# Altium PCB StickHub.altium-ascii.PcbDoc (part 1 of 2)
Units mil, origin at the board's own origin, x right, y up, seen from the top; angles counter-clockwise.
Board outline 649.61 x 1574.8 mil, 2 copper layers (Top Layer, Bottom Layer), stack 65.792 mil thick; 94 components, 47 nets, 278 pads, 87 vias.
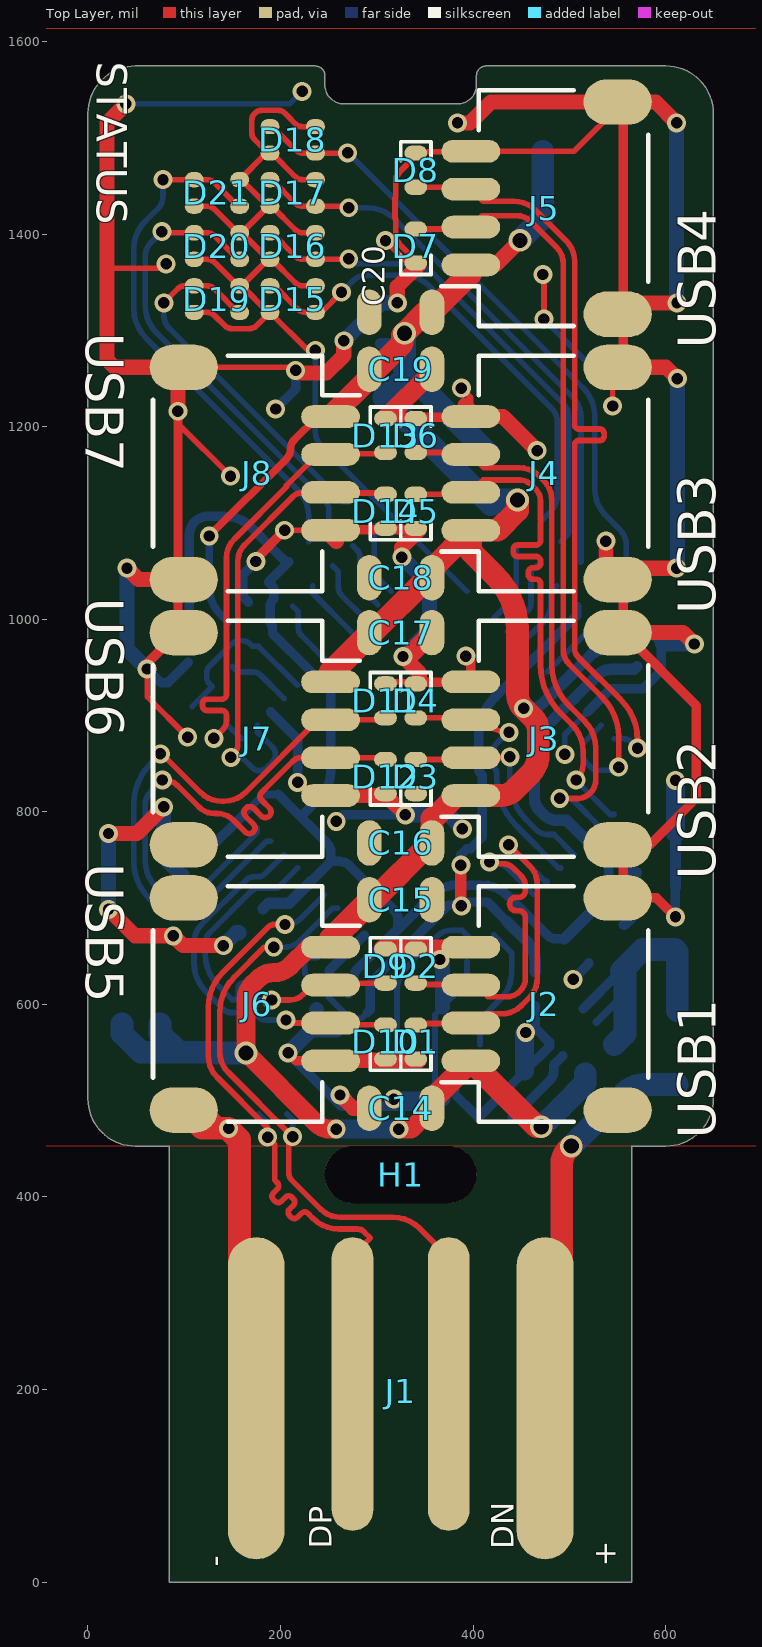
[diagram p0: Top Layer view]
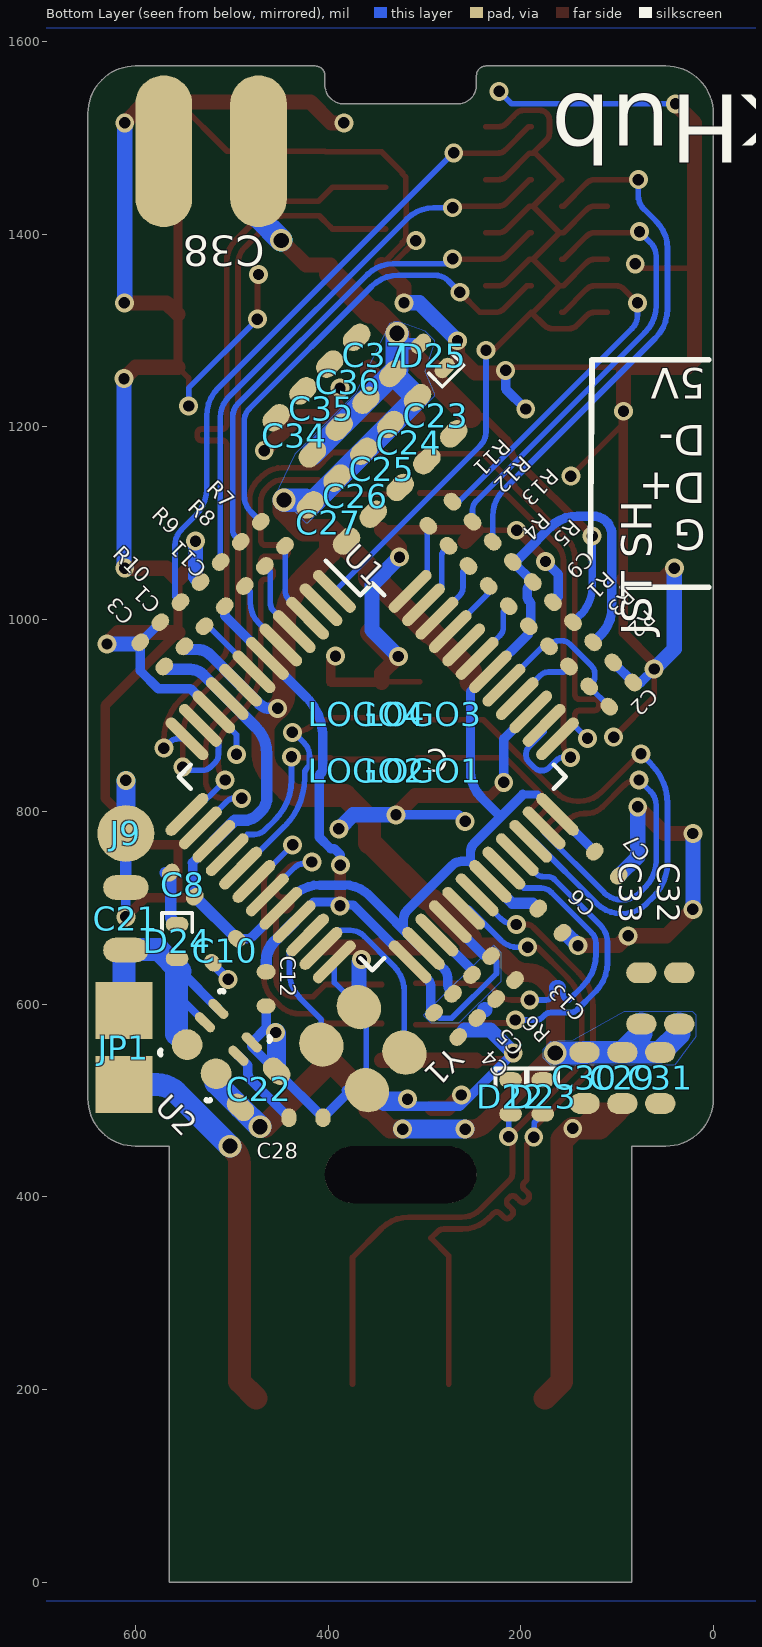
[diagram p1: Bottom Layer view, seen from below]

## Layer stack, top to bottom
Top Solder: solder mask 0.4, Solder Resist, Dk 3.5
Top Layer: signal copper 1.4
Dielectric 1: core 62.9921, FR-4, Dk 4.5
Bottom Layer: signal copper 1.4
Bottom Solder: solder mask 0.4, Solder Resist, Dk 3.5

## Board outline
403.54,1555.12 403.54,1564.96 cw(c413.39,1564.96) 413.39,1574.8 600.39,1574.8 cw(c600.39,1525.59) 649.61,1525.59 649.61,501.97 cw(c600.39,501.97) 600.39,452.76 564.96,452.76 564.96,0 84.65,0 84.65,452.76 49.21,452.76 cw(c49.21,501.97) 0,501.97 0,1525.59 cw(c49.21,1525.59) 49.21,1574.8 236.22,1574.8 cw(c236.22,1564.96) 246.06,1564.96 246.06,1555.12 ccw(c265.75,1555.12) 265.75,1535.43 383.86,1535.43 ccw(c383.86,1555.12)

## Design rules (kind name [scope] priority, off if disabled: settings)
AssemblyTestPointUsage [All] p0: scope1count=1 scope1_0_kind=Board scope1_0_value=Board scope2count=1 scope2_0_kind=Board scope2_0_value=Board commentlength=0
AssemblyTestpoint [All] p0: scope1count=1 scope1_0_kind=Board scope1_0_value=Board scope2count=1 scope2_0_kind=Board scope2_0_value=Board commentlength=0
BoardOutlineClearance [All] p0: scope1count=1 scope1_0_kind=Board scope1_0_value=Board scope2count=1 scope2_0_kind=Board scope2_0_value=Board commentlength=0 gap=0
BoardOutlineClearance [All] p1: gap=0 ignorepadtopadclearanceinfootprint=FALSE
Clearance [All] p0: scope1count=1 scope1_0_kind=Board scope1_0_value=Board scope2count=1 scope2_0_kind=Board scope2_0_value=Board commentlength=0 gap=5.91
Clearance [All] p1: gap=5.91 ignorepadtopadclearanceinfootprint=FALSE
ComponentClearance [All] p0: scope1count=1 scope1_0_kind=Board scope1_0_value=Board scope2count=1 scope2_0_kind=Board scope2_0_value=Board commentlength=0 gap=10 collisioncheckmode=3
DiffPairsRouting [All] p0: scope1count=1 scope1_0_kind=Board scope1_0_value=Board scope2count=1 scope2_0_kind=Board scope2_0_value=Board commentlength=0
DiffPairsRouting [All] p1: maxlimit=5.91 minlimit=5.91 mostfreqgap=5.91 toplayer_minwidth=15 toplayer_maxwidth=15 toplayer_prefwidth=5.91 bottomlayer_minwidth=15 bottomlayer_maxwidth=15 bottomlayer_prefwidth=15 maxuncoupledlength=500
FabricationTestPointUsage [All] p0: scope1count=1 scope1_0_kind=Board scope1_0_value=Board scope2count=1 scope2_0_kind=Board scope2_0_value=Board commentlength=0 valid=0 allowmultiple=FALSE
FabricationTestpoint [All] p0: scope1count=1 scope1_0_kind=Board scope1_0_value=Board scope2count=1 scope2_0_kind=Board scope2_0_value=Board commentlength=0 side=3 testpointundercomponent=TRUE minsize=40 maxsize=100 preferedsize=60 minholesize=0 maxholesize=40 preferedholesize=32 testpointgrid=1
FanoutControl Fanout_BGA [All] p0 off: scope1count=1 scope1_0_kind=Board scope1_0_value=Board scope2count=1 scope2_0_kind=Board scope2_0_value=Board commentlength=69 // Protel DXP Scope 1 Expression Was: IsBGA   Fanout_BGA (Default Rule)
FanoutControl Fanout_LCC [All] p0 off: scope1count=1 scope1_0_kind=Board scope1_0_value=Board scope2count=1 scope2_0_kind=Board scope2_0_value=Board commentlength=69 // Protel DXP Scope 1 Expression Was: IsLCC   Fanout_LCC (Default Rule)
FanoutControl Fanout_SOIC [All] p0 off: scope1count=1 scope1_0_kind=Board scope1_0_value=Board scope2count=1 scope2_0_kind=Board scope2_0_value=Board commentlength=71 // Protel DXP Scope 1 Expression Was: IsSOIC   Fanout_SOIC (Default Rule)
FanoutControl Fanout_Small [All] p0 off: scope1count=1 scope1_0_kind=Board scope1_0_value=Board scope2count=1 scope2_0_kind=Board scope2_0_value=Board commentlength=84 // Protel DXP Scope 1 Expression Was: (CompPinCount < 5)   Fanout_Small (Default Rule)
FanoutControl Fanout_Default [All] p0: scope1count=1 scope1_0_kind=Board scope1_0_value=Board scope2count=1 scope2_0_kind=Board scope2_0_value=Board commentlength=30 // Fanout_Default (Default Rule)
Height [All] p0: scope1count=1 scope1_0_kind=Board scope1_0_value=Board scope2count=1 scope2_0_kind=Board scope2_0_value=Board commentlength=0
HoleSize [All] p0: scope1count=1 scope1_0_kind=Board scope1_0_value=Board scope2count=1 scope2_0_kind=Board scope2_0_value=Board commentlength=0 absolutevalues=TRUE maxlimit=157.48 minlimit=9.84 maxpercent=80.000 minpercent=20.000
HoleSize [All] p1: absolutevalues=TRUE maxlimit=157.48 minlimit=9.84 maxpercent=80.000 minpercent=20.000
HoleToHoleClearance [All] p0: scope1count=1 scope1_0_kind=Board scope1_0_value=Board scope2count=1 scope2_0_kind=Board scope2_0_value=Board commentlength=0
HoleToHoleClearance [All] p1: gap=9.84 allowstackedmicrovias=FALSE
LayerPairs [All] p0: scope1count=1 scope1_0_kind=Board scope1_0_value=Board scope2count=1 scope2_0_kind=Board scope2_0_value=Board commentlength=0 enforce=TRUE
MinimumAnnularRing [All] p0: scope1count=1 scope1_0_kind=Board scope1_0_value=Board scope2count=1 scope2_0_kind=Board scope2_0_value=Board commentlength=0 minimumring=3.94
MinimumAnnularRing [All] p1: minimumring=3.94
MinimumSolderMaskSliver [All] p0: scope1count=1 scope1_0_kind=Board scope1_0_value=Board scope2count=1 scope2_0_kind=Board scope2_0_value=Board commentlength=0
NetAntennae [All] p0: scope1count=1 scope1_0_kind=Board scope1_0_value=Board scope2count=1 scope2_0_kind=Board scope2_0_value=Board commentlength=0
PasteMaskExpansion [All] p0: scope1count=1 scope1_0_kind=Board scope1_0_value=Board scope2count=1 scope2_0_kind=Board scope2_0_value=Board commentlength=0 expansion=0
PlaneClearance [All] p0: scope1count=1 scope1_0_kind=Board scope1_0_value=Board scope2count=1 scope2_0_kind=Board scope2_0_value=Board commentlength=0 clearance=20
PlaneConnect [All] p0: scope1count=1 scope1_0_kind=Board scope1_0_value=Board scope2count=1 scope2_0_kind=Board scope2_0_value=Board commentlength=0 planeconnectstyle=Relief reliefexpansion=20 reliefentries=4 reliefconductorwidth=10 reliefairgap=10
PolygonConnect "PolygonConnect_Polygon 0" [All] p0 off: scope1count=1 scope1_0_kind=Board scope1_0_value=Board scope2count=1 scope2_0_kind=Board scope2_0_value=Board commentlength=66 connectstyle=Direct reliefconductorwidth=10 reliefentries=4 polygonreliefangle="90 Angle" // Protel DXP Scope 1 Expression Was: InNamedPolygon('Polygon 0')
PolygonConnect "PolygonConnect_Polygon 1" [All] p0 off: scope1count=1 scope1_0_kind=Board scope1_0_value=Board scope2count=1 scope2_0_kind=Board scope2_0_value=Board commentlength=66 connectstyle=Direct reliefconductorwidth=10 reliefentries=4 polygonreliefangle="90 Angle" // Protel DXP Scope 1 Expression Was: InNamedPolygon('Polygon 1')
PolygonConnect "PolygonConnect_Polygon 2" [All] p0 off: scope1count=1 scope1_0_kind=Board scope1_0_value=Board scope2count=1 scope2_0_kind=Board scope2_0_value=Board commentlength=66 connectstyle=Direct reliefconductorwidth=10 reliefentries=4 polygonreliefangle="90 Angle" // Protel DXP Scope 1 Expression Was: InNamedPolygon('Polygon 2')
PolygonConnect "PolygonConnect_Polygon 3" [All] p0 off: scope1count=1 scope1_0_kind=Board scope1_0_value=Board scope2count=1 scope2_0_kind=Board scope2_0_value=Board commentlength=66 connectstyle=Direct reliefconductorwidth=10 reliefentries=4 polygonreliefangle="90 Angle" // Protel DXP Scope 1 Expression Was: InNamedPolygon('Polygon 3')
PolygonConnect "PolygonConnect_Polygon 4" [All] p0 off: scope1count=1 scope1_0_kind=Board scope1_0_value=Board scope2count=1 scope2_0_kind=Board scope2_0_value=Board commentlength=66 connectstyle=Direct reliefconductorwidth=10 reliefentries=4 polygonreliefangle="90 Angle" // Protel DXP Scope 1 Expression Was: InNamedPolygon('Polygon 4')
PolygonConnect [All] p0: scope1count=1 scope1_0_kind=Board scope1_0_value=Board scope2count=1 scope2_0_kind=Board scope2_0_value=Board commentlength=0 connectstyle=Relief reliefconductorwidth=19.68 reliefentries=4 polygonreliefangle="90 Angle"
PolygonConnect "PolygonConnect_Polygon 0" [InNamedPolygon('Polygon 0')] p1: connectstyle=Direct reliefconductorwidth=10 reliefentries=4 polygonreliefangle="90 Angle" airgapwidth=10
PolygonConnect "PolygonConnect_Polygon 1" [InNamedPolygon('Polygon 1')] p2: connectstyle=Direct reliefconductorwidth=10 reliefentries=4 polygonreliefangle="90 Angle" airgapwidth=10
PolygonConnect "PolygonConnect_Polygon 2" [InNamedPolygon('Polygon 2')] p3: connectstyle=Direct reliefconductorwidth=10 reliefentries=4 polygonreliefangle="90 Angle" airgapwidth=10
PolygonConnect "PolygonConnect_Polygon 3" [InNamedPolygon('Polygon 3')] p4: connectstyle=Direct reliefconductorwidth=10 reliefentries=4 polygonreliefangle="90 Angle" airgapwidth=10
PolygonConnect "PolygonConnect_Polygon 4" [InNamedPolygon('Polygon 4')] p5: connectstyle=Direct reliefconductorwidth=10 reliefentries=4 polygonreliefangle="90 Angle" airgapwidth=10
PolygonConnect [All] p6: connectstyle=Relief reliefconductorwidth=19.68 reliefentries=4 polygonreliefangle="90 Angle" airgapwidth=19.68
RoutingCorners [All] p0: scope1count=1 scope1_0_kind=Board scope1_0_value=Board scope2count=1 scope2_0_kind=Board scope2_0_value=Board commentlength=0 cornerstyle=45-Degree minsetback=100 maxsetback=100
RoutingLayers [All] p0: scope1count=1 scope1_0_kind=Board scope1_0_value=Board scope2count=1 scope2_0_kind=Board scope2_0_value=Board commentlength=0 top layer=Automatic bottom layer=Automatic
RoutingPriority [All] p0: scope1count=1 scope1_0_kind=Board scope1_0_value=Board scope2count=1 scope2_0_kind=Board scope2_0_value=Board commentlength=0
RoutingTopology [All] p0: scope1count=1 scope1_0_kind=Board scope1_0_value=Board scope2count=1 scope2_0_kind=Board scope2_0_value=Board commentlength=0 topology=Shortest
RoutingVias [All] p0: scope1count=1 scope1_0_kind=Board scope1_0_value=Board scope2count=1 scope2_0_kind=Board scope2_0_value=Board commentlength=0 holewidth=11.81 width=19.68 viastyle="Through Hole" minholewidth=9.84 minwidth=19.68 maxholewidth=15.75 maxwidth=23.62
RoutingVias [All] p1: holewidth=11.81 width=19.68 viastyle="Through Hole" minholewidth=9.84 minwidth=19.68 maxholewidth=15.75 maxwidth=23.62
ShortCircuit [All] p0: scope1count=1 scope1_0_kind=Board scope1_0_value=Board scope2count=1 scope2_0_kind=Board scope2_0_value=Board commentlength=0 allowed=FALSE
SilkToBoardRegionClearance [All] p0: scope1count=1 scope1_0_kind=Board scope1_0_value=Board scope2count=1 scope2_0_kind=Board scope2_0_value=Board commentlength=0
SilkToSilkClearance [All] p0: scope1count=1 scope1_0_kind=Board scope1_0_value=Board scope2count=1 scope2_0_kind=Board scope2_0_value=Board commentlength=0
SilkToSilkClearance [All] p1: silktosilkclearance=0
SilkToSolderMaskClearance [All] p0 off: scope1count=1 scope1_0_kind=Board scope1_0_value=Board scope2count=1 scope2_0_kind=Board scope2_0_value=Board commentlength=44 // Protel DXP Scope 1 Expression Was: IsPad
SolderMaskExpansion [All] p0: scope1count=1 scope1_0_kind=Board scope1_0_value=Board scope2count=1 scope2_0_kind=Board scope2_0_value=Board commentlength=0 expansion=0
SolderMaskExpansion [All] p1: expansion=0 istentingtop=FALSE
UnRoutedNet [All] p0: scope1count=1 scope1_0_kind=Board scope1_0_value=Board scope2count=1 scope2_0_kind=Board scope2_0_value=Board commentlength=0
UnpouredPolygon [All] p0: scope1count=1 scope1_0_kind=Board scope1_0_value=Board scope2count=1 scope2_0_kind=Board scope2_0_value=Board commentlength=0
Width [All] p0: scope1count=1 scope1_0_kind=Board scope1_0_value=Board scope2count=1 scope2_0_kind=Board scope2_0_value=Board commentlength=0 maxlimit=23.62 minlimit=5.91 preferedwidth=5.91
Width [All] p1: maxlimit=23.62 minlimit=5.91 preferedwidth=5.91
26 further rules are at their usual default settings.

## Components (designator, comment, footprint, x,y, rotation, side; value= is the part's Value field where it differs from the comment)
C1 "1uF 10V" 1005_C 561.93,984.46 r45 bottom
C2 "0.1uF" 1005_C 95.63,921.82 r135 bottom
C3 "10uF 6.3V" 1005_C 582.81,963.58 r45 bottom
C4 "10uF 6.3V" 1005_C 277.56,578.74 r225 bottom
C5 "0.1uF" 1005_C 257.87,598.43 r225 bottom
C6 "0.1uF" 1005_C 169.29,687.01 r225 bottom
C7 "0.1uF" 1005_C 110.74,746.14 r225 bottom
C8 "0.1uF" 1005_C 551.18,724.41 r45 bottom
C9 "0.1uF" 1005_C 179.14,1005.34 r135 bottom
C10 "0.1uF" 1005_C 507.44,655.66 r315 bottom
C11 "0.1uF" 1005_C 520.17,1026.22 r45 bottom
C12 "0.1uF" 1005_C 464.57,616.14 r270 bottom
C13 "0.1uF" 1005_C 218.5,637.8 r225 bottom
C14 "0.1uF 100V" 2012_C 324.8,492.13 r180 top
C15 "0.1uF 100V" 2012_C 324.8,708.66 r0 top
C16 "0.1uF 100V" 2012_C 324.8,767.72 r180 top
C17 "0.1uF 100V" 2012_C 324.8,986.22 r0 top
C18 "0.1uF 100V" 2012_C 324.8,1043.31 r180 top
C19 "0.1uF 100V" 2012_C 324.8,1259.84 r0 top
C20 "0.1uF 100V" 2012_C 324.8,1318.9 r180 top
C21 "0.1uF 100V" 2012_C 610.24,688.98 r90 bottom
C22 "22uF 10V" 1608_C 472.44,511.81 r135 bottom
C23 "22uF 10V" 1608_C 288.53,1211.47 r225 bottom
C24 "22uF 10V" 1608_C 316.37,1183.63 r225 bottom
C25 "22uF 10V" 1608_C 344.21,1155.79 r225 bottom
C26 "22uF 10V" 1608_C 372.05,1127.95 r225 bottom
C27 "22uF 10V" 1608_C 399.89,1100.11 r225 bottom
C28 "15nF" 1005_C 423.23,482.28 r180 bottom
C29 "22uF 10V" 1608_C 94.49,523.62 r270 bottom
C30 "22uF 10V" 1608_C 133.86,523.62 r270 bottom
C31 "22uF 10V" 1608_C 55.12,523.62 r270 bottom
C32 "22uF 10V" 1608_C 35.43,606.3 r90 bottom
C33 "22uF 10V" 1608_C 74.8,606.3 r90 bottom
C34 "22uF 10V" 1608_C 435.32,1190.67 r45 bottom
C35 "22uF 10V" 1608_C 407.48,1218.5 r45 bottom
C36 "22uF 10V" 1608_C 379.64,1246.34 r45 bottom
C37 "22uF 10V" 1608_C 351.8,1274.18 r45 bottom
C38 "330uF 10V" CP_Elec_6.3x11_Board_Edge_Mirrored 521.65,1574.8 r180 bottom
D1 "TVS" D_0402 340.55,561.02 r90 top
D2 "TVS" D_0402 340.55,639.76 r270 top
D3 "TVS" D_0402 340.55,836.61 r90 top
D4 "TVS" D_0402 340.55,915.35 r270 top
D5 "TVS" D_0402 340.55,1112.2 r90 top
D6 "TVS" D_0402 340.55,1190.94 r270 top
D7 "TVS" D_0402 340.55,1387.8 r90 top
D8 "TVS" D_0402 340.55,1466.54 r270 top
D9 "TVS" D_0402 309.06,639.76 r270 top
D10 "TVS" D_0402 309.06,561.02 r90 top
D11 "TVS" D_0402 309.06,915.35 r270 top
D12 "TVS" D_0402 309.06,836.61 r90 top
D13 "TVS" D_0402 309.06,1190.94 r270 top
D14 "TVS" D_0402 309.06,1112.2 r90 top
D15 "USB" Duo_LED_1.6x0.8_Kingbright_APHB1608LZGKSURKC 212.71,1332.68 r0 top
D16 "USB" Duo_LED_1.6x0.8_Kingbright_APHB1608LZGKSURKC 212.71,1387.8 r0 top
D17 "USB" Duo_LED_1.6x0.8_Kingbright_APHB1608LZGKSURKC 212.71,1442.91 r0 top
D18 "USB" Duo_LED_1.6x0.8_Kingbright_APHB1608LZGKSURKC 212.71,1498.03 r0 top
D19 "USB" Duo_LED_1.6x0.8_Kingbright_APHB1608LZGKSURKC 133.97,1332.68 r0 top
D20 "USB" Duo_LED_1.6x0.8_Kingbright_APHB1608LZGKSURKC 133.97,1387.8 r0 top
D21 "USB" Duo_LED_1.6x0.8_Kingbright_APHB1608LZGKSURKC 133.97,1442.91 r0 top
D22 "TVS" D_0402 210.63,503.94 r270 bottom
D23 "TVS" D_0402 177.17,503.94 r270 bottom
D24 "5V" D_0402 557.09,665.35 r270 bottom
D25 "5V" D_0402 291.34,1273.62 r45 bottom
H1 "Strap" Plain_Hole_3mm 324.8,423.23 r0 top
J1 "HOST" USB_A_PCB_traces_small 324.8,0 r90 top
J2 "USB1" JST_SH_SM04B-SRSS-TB_1x04-1MP_P1.00mm_Horizontal 476.38,600.39 r90 top
J3 "USB2" JST_SH_SM04B-SRSS-TB_1x04-1MP_P1.00mm_Horizontal 476.38,875.98 r90 top
J4 "USB3" JST_SH_SM04B-SRSS-TB_1x04-1MP_P1.00mm_Horizontal 476.38,1151.57 r90 top
J5 "USB4" JST_SH_SM04B-SRSS-TB_1x04-1MP_P1.00mm_Horizontal 476.38,1427.17 r90 top
J6 "USB5" JST_SH_SM04B-SRSS-TB_1x04-1MP_P1.00mm_Horizontal 173.23,600.39 r270 top
J7 "USB6" JST_SH_SM04B-SRSS-TB_1x04-1MP_P1.00mm_Horizontal 173.23,875.98 r270 top
J8 "USB7" JST_SH_SM04B-SRSS-TB_1x04-1MP_P1.00mm_Horizontal 173.23,1151.57 r270 top
J9 "EXTGND" 1P-1.5x1.5 610.24,777.56 r0 bottom
JP1 "EXTPWR" JP-2_1.5x1.5 610.24,555.12 r90 bottom
LOGO1 "Logo" Creative_Commons_CC_Mask 301.18,842.52 r180 bottom
LOGO2 "Logo" Creative_Commons_BY_Mask 360.24,842.52 r0 bottom
LOGO3 "Logo" Creative_Commons_NC_Mask 301.18,901.57 r0 bottom
LOGO4 "Logo" Creative_Commons_SA_Mask 360.24,901.57 r0 bottom
R1 "10k" R_1005_C 158.26,984.46 r315 bottom
R2 "100k" R_1005_C 116.51,942.7 r135 bottom
R3 "100k" R_1005_C 137.39,963.58 r315 bottom
R4 "100k" R_1005_C 220.9,1047.09 r315 bottom
R5 "100k" R_1005_C 200.02,1026.22 r315 bottom
R6 "2.7k" R_1005_C 238.19,618.11 r225 bottom
R7 "470" R_1005_C 457.53,1088.85 r225 bottom
R8 "470" R_1005_C 478.41,1067.97 r225 bottom
R9 "470" R_1005_C 499.29,1047.09 r225 bottom
R10 "470" R_1005_C 541.05,1005.34 r225 bottom
R11 "470" R_1005_C 283.54,1109.73 r315 bottom
R12 "470" R_1005_C 262.66,1088.85 r315 bottom
R13 "470" R_1005_C 241.78,1067.97 r315 bottom
U1 "MaxLinear_XR22417-48" LQFP-48_7x7mm_P0.5mm 354.33,836.61 r225 bottom
U2 "Dialog_SLG5NT1487V" TDFN-8_1.5x2mm_Fused-Lead_JEDEC_MO-252_W2015D 517.72,557.09 r225 bottom
Y1 "12MHz 50ppm 16-20pF" Crystal_4-SMD_2.5x2mm 364.07,554.05 r225 bottom

## Footprints (in the part's own frame and the unit in brackets; to place one, negate y for a bottom-side part, rotate by r counter-clockwise, add the part's x,y. Pads: shape width x height; smd on the part's side, far side on the other; paste and mask are expansions set on the pad)
1P-1.5x1.5 [mm]
  round 1.5 smd paste-1.5: 1(0,0)
1005_C [mm]
  oval 0.4x0.5 smd: 1(-0.45,0) 2(0.45,0)
1608_C [mm]
  oval 0.55x0.8 smd: 1(-0.675,0) 2(0.675,0)
2012_C [mm]
  oval 0.65x1.2 smd: 1(-0.825,0) 2(0.825,0)
CP_Elec_6.3x11_Board_Edge_Mirrored [mm]
  oval 1.5x4 smd paste-4: 1(1.25,-2.25) 2(-1.25,-2.25)
Creative_Commons_BY_Mask [mil]
Creative_Commons_CC_Mask [mil]
Creative_Commons_NC_Mask [mil]
Creative_Commons_SA_Mask [mil]
Crystal_4-SMD_2.5x2mm [mm]
  oval 1.2x1.1 smd paste-1.2: 1(-0.85,-0.7) 2(0.85,-0.7) 3(0.85,0.7) 4(-0.85,0.7)
  round 1 smd: ""(-0.85,-0.7) ""(-0.85,0.7) ""(0.85,-0.7) ""(0.85,0.7)
D_0402 [mm]
  oval 0.4x0.6 smd: 1(-0.45,0) 2(0.45,0)
  silkscreen extent -0.75,-0.4 -0.25,0.4
Duo_LED_1.6x0.8_Kingbright_APHB1608LZGKSURKC [mm]
  oval 0.5x0.4 smd: GA(0.6,-0.35) GK(-0.6,-0.35) RA(0.6,0.35) RK(-0.6,0.35)
JP-2_1.5x1.5 [mm]
  rect 1.5x1.5 smd paste-1.5: 1(-0.975,0.05) 2(0.975,0.05)
JST_SH_SM04B-SRSS-TB_1x04-1MP_P1.00mm_Horizontal [mm]
  oval 0.6x1.55 smd: 1(-1.5,2) 2(-0.5,2) 3(0.5,2) 4(1.5,2)
  oval 1.2x1.8 smd: MP(-2.8,-1.875) MP(2.8,-1.875)
  silkscreen extent -3.11,-2.69 3.11,2.78
LQFP-48_7x7mm_P0.5mm [mm]
  oval 1.475x0.3 smd: 1(-4.162,2.75) 2(-4.162,2.25) 3(-4.162,1.75) 4(-4.162,1.25) 5(-4.162,0.75) 6(-4.162,0.25) 7(-4.162,-0.25) 8(-4.162,-0.75) 9(-4.162,-1.25) 10(-4.162,-1.75) 11(-4.162,-2.25) 12(-4.162,-2.75) 25(4.163,-2.75) 26(4.162,-2.25) 27(4.163,-1.75) 28(4.163,-1.25) 29(4.163,-0.75) 30(4.162,-0.25) 31(4.163,0.25) 32(4.163,0.75) 33(4.163,1.25) 34(4.162,1.75) 35(4.162,2.25) 36(4.163,2.75)
  oval 0.3x1.475 smd: 13(-2.75,-4.162) 14(-2.25,-4.162) 15(-1.75,-4.162) 16(-1.25,-4.162) 17(-0.75,-4.162) 18(-0.25,-4.162) 19(0.25,-4.162) 20(0.75,-4.162) 21(1.25,-4.162) 22(1.75,-4.162) 23(2.25,-4.162) 24(2.75,-4.162) 37(2.75,4.163) 38(2.25,4.162) 39(1.75,4.162) 40(1.25,4.163) 41(0.75,4.163) 42(0.25,4.163) 43(-0.25,4.162) 44(-0.75,4.162) 45(-1.25,4.163) 46(-1.75,4.163) 47(-2.25,4.162) 48(-2.75,4.163)
  silkscreen extent -4.9,-3.61 3.61,3.61
Plain_Hole_3mm [mm]
  oval 4x1.5 hole 1.5 slot 4 at 0 deg unplated: ""(0,0)
R_1005_C [mm]
  oval 0.4x0.5 smd: 1(-0.45,0) 2(0.45,0)
TDFN-8_1.5x2mm_Fused-Lead_JEDEC_MO-252_W2015D [mm]
  oval 0.65x0.25 smd: 1(-0.625,0.75) 2(-0.625,0.25) 7(0.625,0.25) 8(0.625,0.75)
  oval 0.815x0.8 smd: 3(-0.543,-0.5) 5(0.543,-0.5)
  silkscreen extent -0.93,-1.17 0.93,1.18
USB_A_PCB_traces_small [mm]
  oval 8.5x1.5 smd paste-8.5: 1(4.85,-3.81) 4(4.85,3.81)
  oval 7.75x1.1 smd paste-7.75: 2(5.225,-1.27) 3(5.225,1.27)

## Via types
v1: diameter 19.68, hole 11.81, Top Layer to Bottom Layer, 81 vias
v2: diameter 23.62, hole 15.75, Top Layer to Bottom Layer, 6 vias

## Nets (pads, with @x,y where several pads share a name; then routed paths per layer and width w, separated by ;. In a path a pad name is that pad's centre, name@x,y a point inside that pad or via, vN(x,y) a via of type N, cw(c..) or ccw(c..) an arc to the next point about the centre after c; other vN are vias at no path point)
+1V8: C4.1 C11.1 C12.1 C13.1 U1.6 U1.21 U1.25 U1.28 | length 809.4
  Top Layer w11.81: v1(387.4,744.69) 387.4,702.76 v1(387.8,702.36)
  Bottom Layer w5.91: C13.1@231.03,650.32 225.32,644.62 225.32,632.09 271.85,585.56 284.38,585.56 C4.1@290.09,591.27
  Bottom Layer w9.84: C13.1@231.03,650.32 237.64,650.32 U1.28@273.25,685.94 ; C4.1@290.09,591.27 293.33,594.52 293.33,617.61 cw(c305.15,617.61) 296.79,625.96 U1.25@315.01,644.18 374.09,703.26 386.9,703.26 v1(387.8,702.36) ; v1(387.4,744.69) 387.4,755.51 393.56,761.67 397.49,761.67 409.59,773.77 409.59,838.14 406.92,840.82 405.72,843.71 405.71,845.27 405.71,877.45 405.79,882.09 407.24,891.26 410.11,900.09 414.33,908.36 419.78,915.87 423.01,919.21 U1.6@463.25,959.45 507.64,1003.85 C11.1@507.64,1013.69 ; v1@387.8,702.81 v1(387.8,702.36) ; U1.21@435.41,685.94 414.98,706.37 391.8,706.37 v1(387.8,702.36)
  Bottom Layer w11.81: U1.21@435.41,685.94 455.92,665.43 cw(c435.04,644.55) 464.57,644.55 C12.1@464.57,633.86
+3.3V: C3.1 C5.1 C6.1 C7.1 C8.1 C9.1 C10.1 R3.1 R4.1 R5.1 U1.9 U1.15 U1.20 U1.26 U1.31 U1.36 U1.42 | length 1698.3
  Bottom Layer w7.87: U1.36@161.89,797.29 182.68,818.08 197.76,818.08
  Bottom Layer w9.84: C7.1@123.27,758.67 U1.36@161.89,797.29 ; R3.1@124.86,976.11 116.85,984.12 cw(c144.68,1011.96) 105.31,1011.96 105.31,1087.6 cw(c125,1087.6) 125,1107.28 141.56,1107.28 cw(c141.56,1067.91) 169.4,1095.75 195.08,1070.07 205.53,1059.62 R4.1@208.37,1059.62 R5.1@187.5,1038.74 191.47,1034.77 cw(c187.3,1030.59) 193.2,1030.59 193.2,1023.51 cw(c187.3,1023.51) 191.47,1019.34 191.18,1019.05 ccw(c195.36,1014.87) 189.45,1014.87 189.45,997.47 ccw(c195.36,997.47) 191.18,993.3 C9.1@191.67,992.81 191.67,985.35 U1.42@231.49,945.53 252.28,924.75 252.28,843.79 252.28,842.53 cw(c212.91,842.53) 240.75,814.7 222.9,796.85 218.99,796.85 211.68,804.16 ; 197.76,818.08 211.68,804.16 ; U1.31@231.49,727.69 252.28,748.48 ; C5.1@270.4,610.95 272.65,613.2 ccw(c264.3,621.55) 276.11,621.55 276.11,628.22 cw(c287.92,628.22) 279.57,636.58 U1.26@301.09,658.1 ; C10.1@494.92,668.19 485.89,668.19 cw(c485.89,680) 477.54,671.65 U1.20@449.33,699.86 436.7,712.48 ccw(c408.86,684.65) 408.86,724.02 383.06,724.02 ccw(c383.06,688.58) 358.01,713.64 302.47,658.1 U1.26@301.09,658.1 ; U1.15@518.93,769.45 541.17,747.21 540.98,747.02 540.98,714.2 C8.1@538.65,711.88 C8.1@541.17,714.4 ; 211.68,804.16 243.94,771.9 248.24,767.6 cw(c238.5,757.85) 252.28,757.85 252.28,748.48 ; 252.28,748.48 261.65,748.48 cw(c261.65,734.7) 271.39,744.44 317.84,698 cw(c308.09,688.26) 321.87,688.26 321.87,678.88 U1.26@301.09,658.1
  Bottom Layer w11.81: C6.1@181.82,699.54 187.53,705.24 209.04,705.24 U1.31@231.49,727.69 ; C10.1@494.96,668.19 C8.1@538.65,711.88 ; U1.15@518.93,769.45 497.16,791.22 487.4,791.22 cw(c487.4,810.91) 473.48,796.99 469.55,800.93 cw(c483.46,814.85) 463.78,814.85 463.78,860.16 cw(c503.15,860.16) 475.31,888 U1.9@505.01,917.69 529.56,942.25 cw(c543.48,928.33) 543.48,948.01 567.24,948.01 C3.1@570.28,951.05
+5V: C1.1 C14.1 C15.1 C16.1 C17.1 C18.1 C19.1 C20.1 C22.1 C23.1 C24.1 C25.1 C26.1 C27.1 C29.1 C30.1 C31.1 C32.1 C33.1 C34.1 C35.1 C36.1 C37.1 C38.1 D25.2 J2.1 J3.1 J4.1 J5.1 J6.1 J7.1 J8.1 R1.1 U1.8 U2.5 | length 3452.6
  Top Layer w7.87: v1(125.98,1086.61) 206.28,1166.91 ccw(c196.54,1176.66) 210.32,1176.66 cw(c224.1,1176.69) 214.36,1186.43 238.56,1210.63 J8.1@251.97,1210.63
  Top Layer w15.75: J7.1@248.03,935.04 J7.1@251.97,938.98 ; J8.1@250.43,1210.63 328.74,1288.94 v2(328.74,1297.24) J5.1@399.61,1368.11 ; J6.1@251.97,659.45 292.32,699.8 C15.1@292.32,708.66 ; J7.1@253.94,938.98 283.66,968.7 283.66,970.67 293.31,980.32 293.31,984.25 355.91,1046.85 C18.1@356.3,1046.85 ; C18.1@356.3,1045.28 C18.1@356.3,1046.85 ; J5.1@397.64,1368.11 423.23,1368.11 v2(448.82,1393.7) ; J4.1@425.59,1092.52 403.54,1092.52 400.79,1092.52 356.3,1048.03 C18.1@356.3,1046.85 ; v1(452.62,907.48) 469.63,890.47
  Top Layer w19.68: J6.1@251.97,659.45 229.65,659.45 210.19,639.99 cw(c193.48,656.69) 193.48,633.07 192.86,633.07 ccw(c192.86,609.45) 176.15,626.15 171.09,621.09 ccw(c187.8,604.39) 164.17,604.39 v2(164.17,549.61) 237.54,476.24 ccw(c251.46,490.16) 251.46,470.47 v1(257.87,470.47) ; v1(322.83,470.47) 335.63,470.47 C14.1@357.28,492.13
  Top Layer w23.62: J6.1@251.97,659.45 251.97,668.31 C15.1@292.32,708.66 296.75,708.66 355.81,767.72 C16.1@357.28,767.72 357.28,793.11 358.91,793.11 382.73,816.93 J3.1@397.64,816.93 428.85,816.93 ccw(c428.85,836.61) 442.77,822.69 459.12,839.04 ccw(c438.24,859.92) 467.77,859.92 467.77,884.17 ccw(c448.09,884.17) 462,898.09 v1(452.62,907.48) 451.83,908.27 cw(c465.75,922.19) 446.06,922.19 446.06,989.43 ccw(c367.32,989.43) 423,1045.11 397.64,1070.47 J4.1@397.64,1092.52 ; J7.1@251.97,935.04 251.97,945.87 C17.1@292.32,986.22 295.77,986.22 352.85,1043.31 C18.1@357.28,1043.31 357.28,1052.17 J4.1@397.64,1092.52 ; J8.1@251.97,1210.63 292.32,1250.98 C19.1@292.32,1259.84 299.65,1259.84 326.57,1286.77 326.57,1295.08 v2(328.74,1297.24) 350.39,1318.9 C20.1@357.28,1318.9 J5.1@397.64,1359.25 ; C14.1@357.28,492.13 357.28,500.98 J2.1@397.64,541.34 466.14,472.83 v2(470.87,472.83) ; v2(446.06,1124.02) 446.06,1112.99 425.59,1092.52 J4.1@397.64,1092.52
  Bottom Layer w7.87: v1(125.98,1086.61) 125.98,1033.04 ccw(c165.35,1033.04) 137.52,1005.21 R1.1@145.74,996.98
  Bottom Layer w11.81: D25.2@303.87,1286.15 317.65,1286.15 v2(328.74,1297.24) ; v1(452.62,907.48) 460.43,907.48 ccw(c460.43,923.22) 471.56,912.09 U1.8@491.09,931.61 522.44,962.96 cw(c536.36,949.04) 536.36,968.73 546.2,968.73 C1.1@549.4,971.93
  Bottom Layer w19.68: v1(257.87,470.47) v1(322.83,470.47)
  Bottom Layer w23.62: C32.1@35.43,579.72 35.43,569.88 C31.1@55.12,550.2 C29.1@94.49,550.2 ; C33.1@74.8,579.72 74.8,569.88 C29.1@94.49,550.2 ; v2(164.17,549.61) 134.45,549.61 C30.1@133.86,550.2 C29.1@94.49,550.2 ; v2@328.18,1296.68 v2(328.74,1297.24) 328.74,1259.66 C37.1@333.01,1255.39 ; C34.1@416.53,1171.87 C37.1@333.01,1255.39 ; v2(446.06,1124.02) 423.79,1124.02 C27.1@418.68,1118.91 C23.1@307.32,1230.26 307.88,1230.26 C37.1@333.01,1255.39 ; v2(448.82,1393.7) 472.44,1417.32 C38.1@472.44,1486.22 ; v2(470.87,472.83) 471.05,472.83 C22.1@491.23,493.02 516.53,518.32 U2.5@516.53,528.06
/D+: D23.2 J1.3 U1.30 | length 738.3
  Top Layer w5.91: v1(204.63,683.04) 193.97,683.04 ccw(c193.97,673.2) 187.01,680.16 139.99,633.14 ccw(c176.18,596.95) 125,596.95 125,546.54 ccw(c156.5,546.54) 134.22,524.27 186.58,471.91 v1(186.58,462.17) 193.9,454.85 193.9,417.52 196.65,414.76 197.31,413.94 197.77,412.98 198.01,411.95 198.01,410.89 197.77,409.86 197.31,408.91 196.65,408.08 192.58,404.01 191.92,403.18 191.46,402.23 191.23,401.2 191.23,400.14 191.46,399.11 191.92,398.16 192.58,397.33 194.25,395.66 195.08,395 196.03,394.54 197.06,394.3 198.12,394.3 199.15,394.54 200.1,395 200.93,395.66 205.01,399.73 205.83,400.39 206.79,400.85 207.82,401.08 208.87,401.08 209.91,400.85 210.86,400.39 211.69,399.73 213.36,398.06 214.02,397.23 214.48,396.28 214.71,395.25 214.71,394.19 214.48,393.16 214.02,392.21 213.36,391.38 209.28,387.31 208.62,386.48 208.17,385.53 207.93,384.49 207.93,383.44 208.17,382.41 208.62,381.45 209.28,380.62 210.95,378.95 211.78,378.29 212.73,377.84 213.77,377.6 214.82,377.6 215.85,377.84 216.81,378.29 217.64,378.95 221.71,383.03 222.54,383.69 223.49,384.15 224.52,384.38 225.58,384.38 226.61,384.15 227.56,383.69 228.39,383.03 233.12,378.29 233.25,378.17 ccw(c261.09,406) 261.09,366.63 279.88,366.63 cw(c279.88,356.79) 286.84,363.75 293.31,357.28 274.8,338.78 274.8,295.59 J1.3@274.8,205.71
  Bottom Layer w5.91: D23.2@177.17,486.22 186.02,477.36 186.02,462.73 v1(186.58,462.17) ; v1(204.63,683.04) 206.53,683.04 ccw(c206.53,702.73) 220.44,688.81 U1.30@245.41,713.78
/D-: D22.2 J1.2 U1.29 | length 734.5
  Top Layer w5.91: v1(192.95,659.41) 182.97,659.41 152.19,628.64 ccw(c189.33,591.5) 136.81,591.5 136.81,550.29 ccw(c165.56,550.29) 145.23,529.97 v1(212.6,462.6) 208.66,458.66 208.66,424.55 ccw(c218.5,424.55) 211.54,417.59 242.12,387.01 ccw(c261.61,406.5) 261.61,378.94 316.57,378.94 cw(c316.57,339.57) 344.41,367.41 374.8,337.01 J1.2@374.8,205.71
  Bottom Layer w5.91: v1(192.95,659.41) 203.61,659.41 ccw(c203.61,683.04) 220.32,666.33 253.84,699.86 U1.29@259.33,699.86 ; D22.2@206.69,486.22 212.6,480.32 v1(212.6,462.6)